# Altium PCB OLED_v2.0.PcbDoc
Units mil, origin at the board's own origin, x right, y up, seen from the top; angles counter-clockwise.
Board outline 1122.05 x 1377.95 mil, 2 copper layers (Top Layer, Bottom Layer), stack 57 mil thick; 27 components, 23 nets, 117 pads, 22 vias.
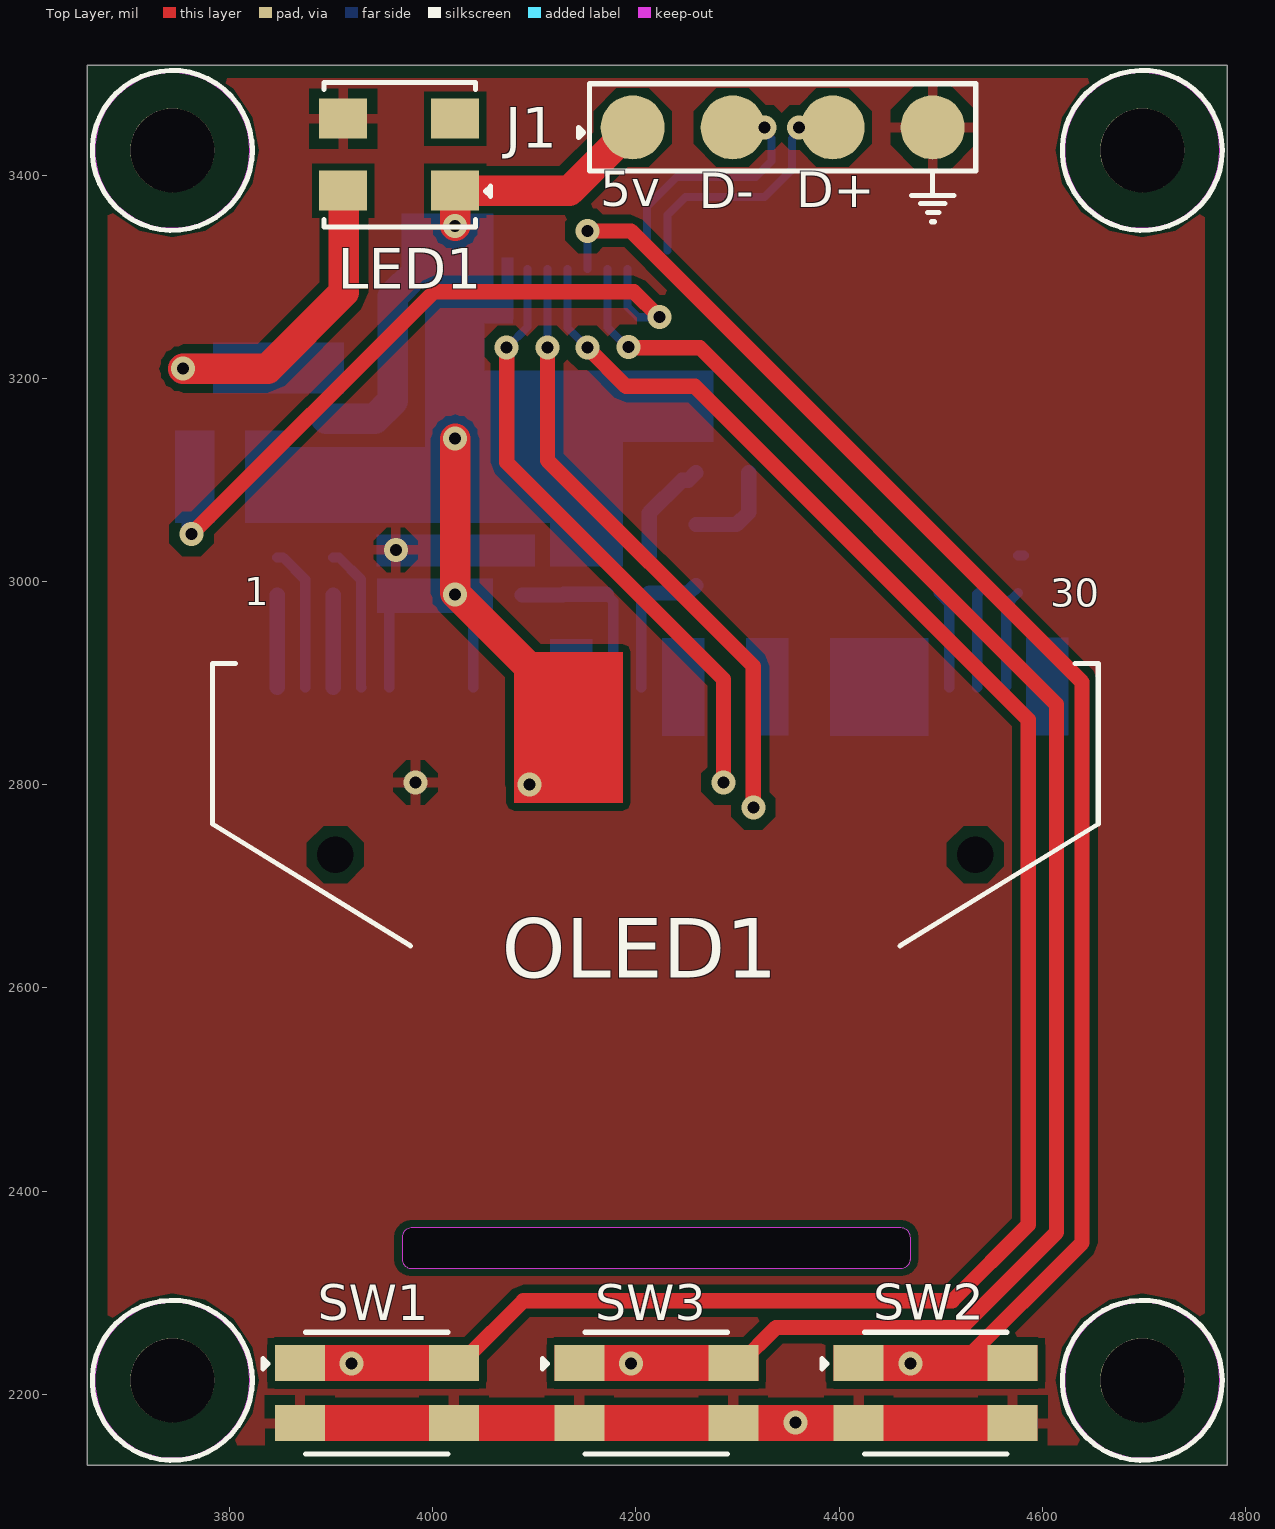
[diagram p0: Top Layer view]
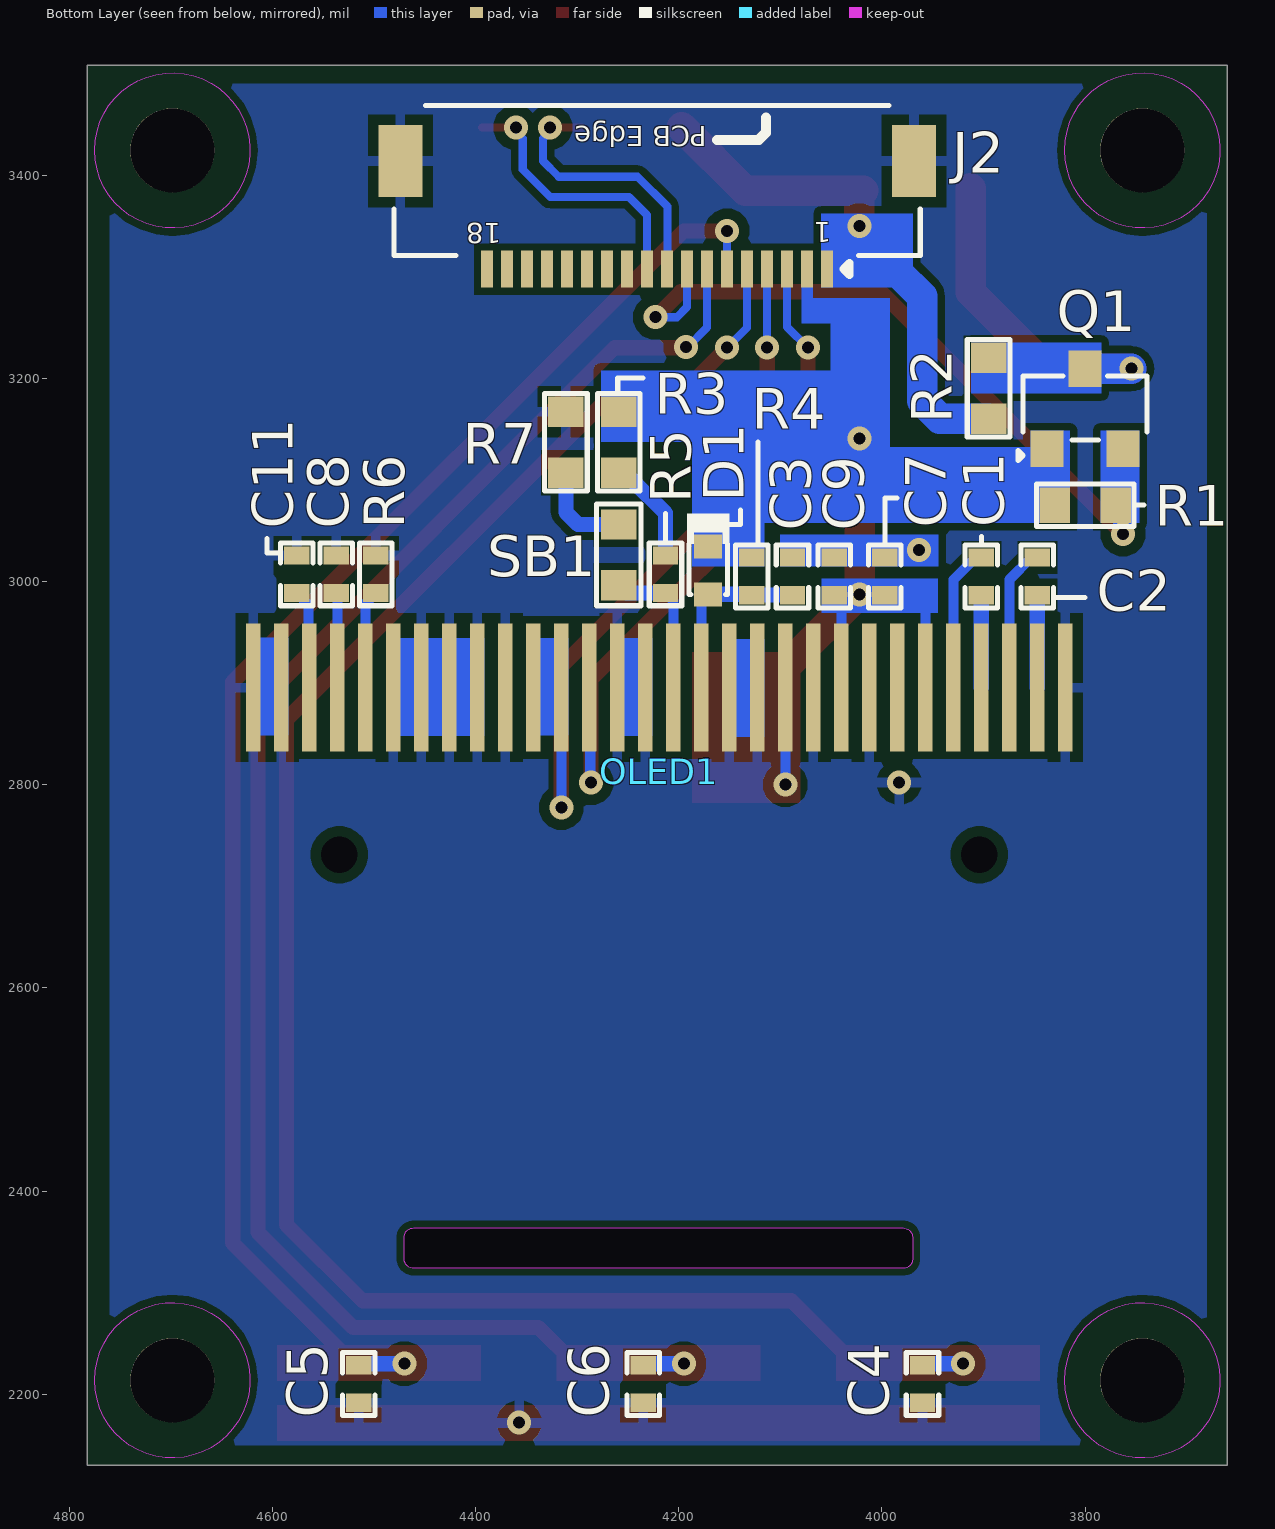
[diagram p1: Bottom Layer view, seen from below]
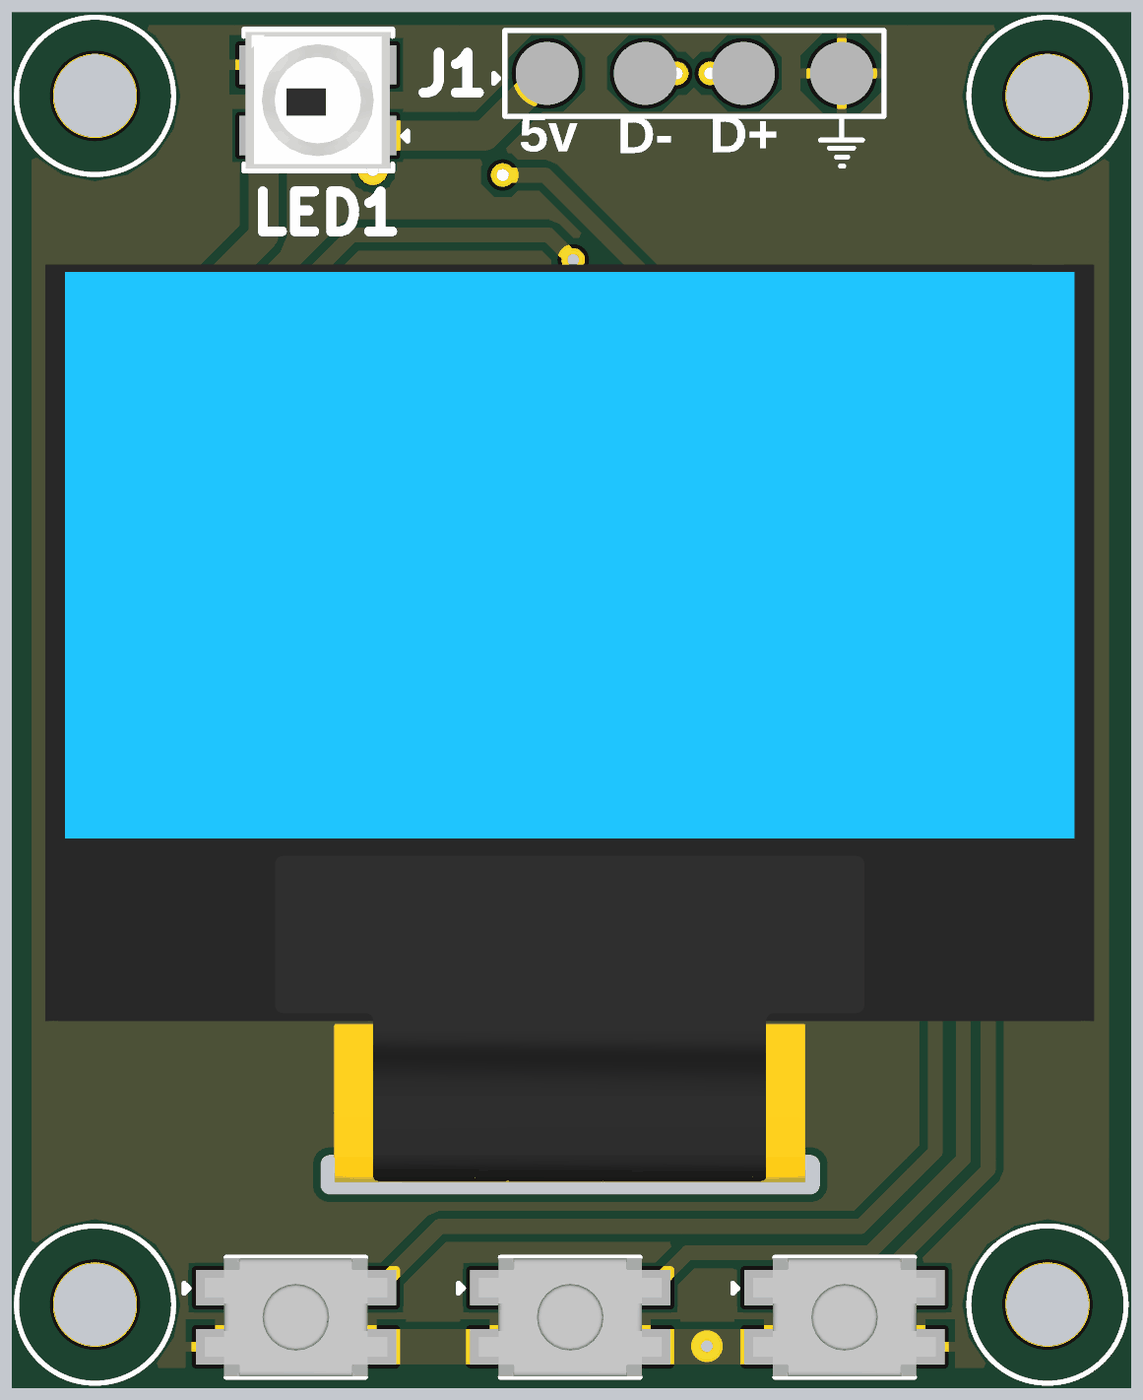
[diagram p2: 3D render of the assembled board from above, using the file's embedded part models]
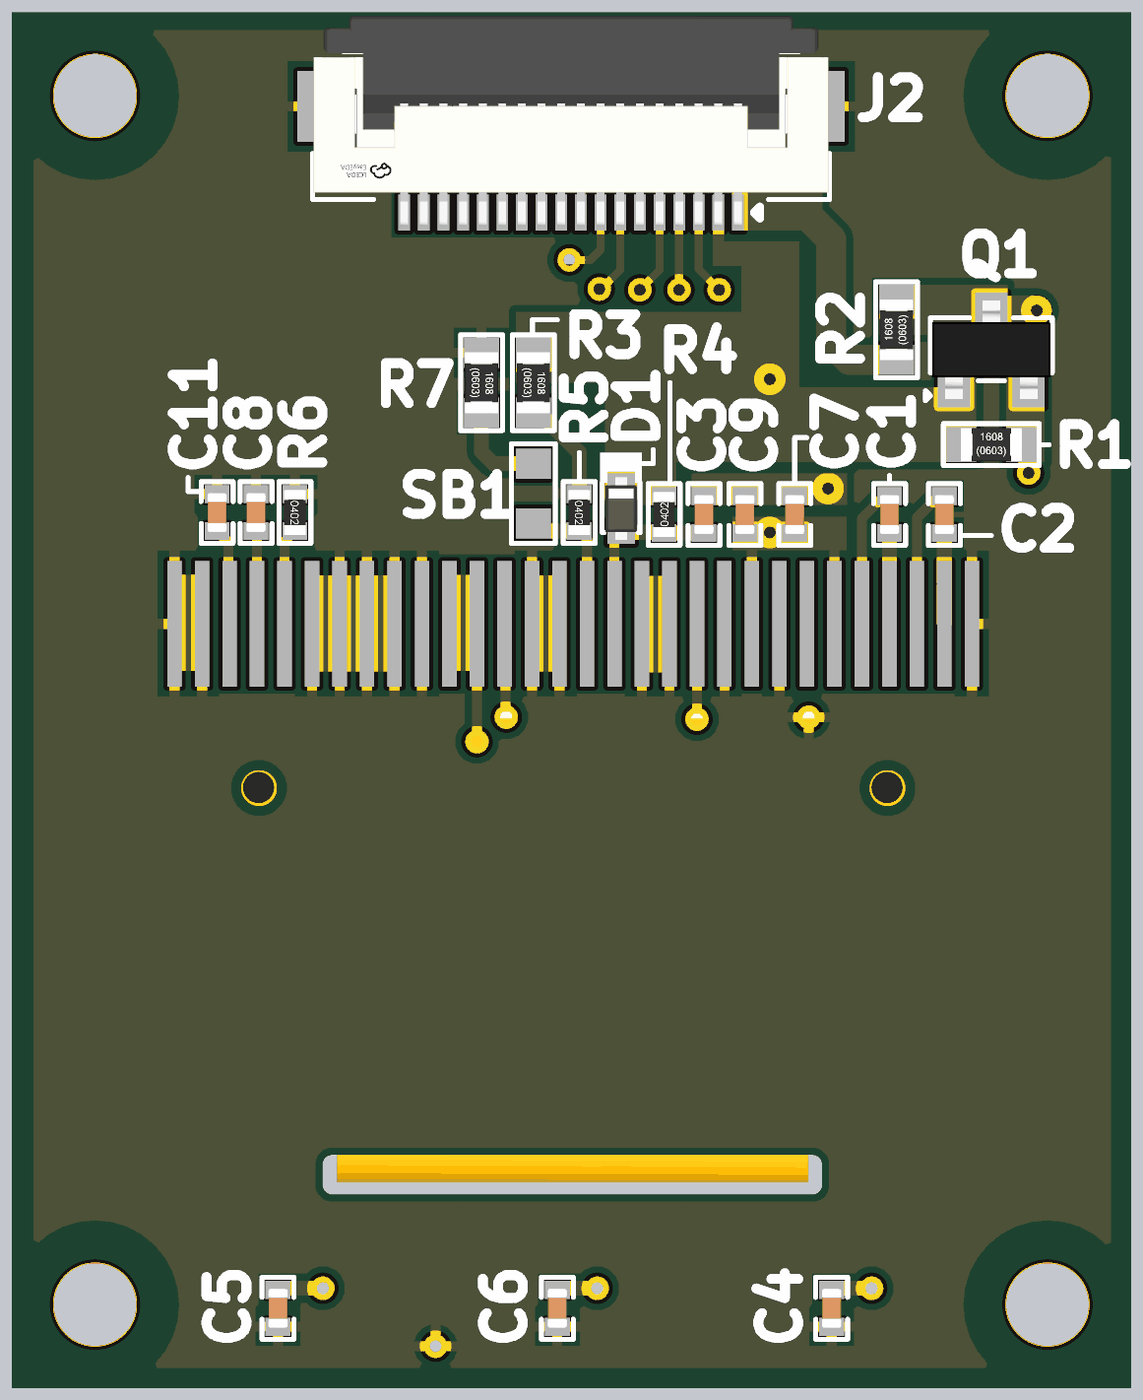
[diagram p3: 3D render of the assembled board from below, using the file's embedded part models]

## Layer stack, top to bottom
Top Solder: solder mask 3, Solder Resist, Dk 3.5
Top Layer: signal copper 10
Dielectric 1: dielectric 37, FR-4, Dk 4.8
Bottom Layer: signal copper 10
Bottom Solder: solder mask 3, Solder Resist, Dk 3.5

## Board outline
3660,2130 3660,3507.95 4782.05,3507.95 4782.05,2130
cut-out: 3969.74,2332.92 ccw(c3978.62,2332.92) 3978.62,2324.03 4460.75,2324 ccw(c4460.75,2333.52) 4470.19,2332.34 ccw(c4470,2332.52) 4470.27,2332.52 4470.27,2354.11 ccw(c4460.74,2354.11) 4460.74,2363.64 4460.21,2363.64 3978.97,2363.64 ccw(c3978.97,2354.43) 3969.77,2354.43

## Design rules (kind name [scope] priority, off if disabled: settings)
Clearance Clearance_TOP [All] p1: gap=10 ignorepadtopadclearanceinfootprint=FALSE except(0: Arc-Hole Track-Hole SMDPad-Hole THPad-Hole Via-Hole Fill-Hole Poly-Hole Region-Hole Text-Hole; 6: SMDPad-SMDPad; 7: Arc-Fill Arc-Poly Arc-Region Track-Fill Track-Poly Track-Region SMDPad-Fill SMDPad-Poly SMDPad-Region Fill-Fill Fill-Poly Fill-Region Poly-Poly Poly-Region Region-Region; 8: Arc-SMDPad Track-SMDPad)
Clearance Clearance_BOTTOM [All] p2: gap=10 ignorepadtopadclearanceinfootprint=FALSE except(0: Arc-Hole Track-Hole SMDPad-Hole THPad-Hole Via-Hole Fill-Hole Poly-Hole Region-Hole Text-Hole; 6: Arc-Fill Arc-Poly Arc-Region Track-Fill Track-Poly Track-Region SMDPad-SMDPad SMDPad-Fill SMDPad-Poly SMDPad-Region Fill-Fill Fill-Poly Fill-Region Poly-Poly Poly-Region Region-Region; 8: Arc-SMDPad Track-SMDPad)
DiffPairsRouting [InDifferentialPairClass('USB_DIFF_Lines')] p1: maxlimit=12 minlimit=12 mostfreqgap=12 toplayer_minwidth=8 toplayer_maxwidth=8 toplayer_prefwidth=8 bottomlayer_minwidth=8 bottomlayer_maxwidth=8 bottomlayer_prefwidth=8 impedanceprofiledriven=TRUE impedanceprofileid={845F8E85-610F-405B-9380-0A08DA0184CC} impedanceprofilevalue=90.000000 maxuncoupledlength=500
HoleSize [All] p1: absolutevalues=TRUE maxlimit=1000 minlimit=1 maxpercent=80.000 minpercent=20.000
MatchedLengths "Schematic Matched Net Lengths" [InNetClass('USB_DIFF')] p1: tolerance=20 checknetsindiffpair=TRUE checkdiffpairvsdiffpair=FALSE checkxsignals=FALSE checkothers=FALSE
MaxMinImpedance "Schematic Impedance Constraint" [InNetClass('USB_DIFF')] p1: minimum=85.00 maximum=95.00
MinimumSolderMaskSliver [All] p1: minsoldermaskwidth=0
PolygonConnect [All] p1: connectstyle=Relief reliefconductorwidth=10 reliefentries=4 polygonreliefangle="90 Angle" airgapwidth=10
RoutingVias [All] p1: holewidth=11.81 width=23.62 viastyle="Through Hole" minholewidth=11.81 minwidth=23.62 maxholewidth=11.81 maxwidth=23.62
SilkToSilkClearance [All] p1: silktosilkclearance=0
SilkToSolderMaskClearance [IsPad] p1: minsilkscreentomaskgap=0 clearancetoexposedcopper=TRUE
SolderMaskExpansion [All] p1: expansion=4 istentingtop=FALSE
Width [All] p1: maxlimit=30 minlimit=8 preferedwidth=15 toplayer_minwidth=10 minimp=50.000000 maximp=50.000000 favimp=50.000000
25 further rules are at their usual default settings.

## Classes and differential pairs
differential pair class USB_DIFF_Lines: USB
net class USB_DIFF: USB_N USB_P
differential pair USB: +USB_P -USB_N

## Components (designator, comment, footprint, x,y, rotation, side; value= is the part's Value field where it differs from the comment)
C1 "1uF" Cap-0402 3902,3005 r270 bottom
C2 "1uF" Cap-0402 3847,3005 r270 bottom
C3 "1uF" Cap-0402 4088,3005 r270 bottom
C4 "0.1uF" Cap-0402 3960,2210 r90 bottom
C5 "0.1uF" Cap-0402 4515,2210 r90 bottom
C6 "0.1uF" Cap-0402 4235,2210 r90 bottom
C7 "0.1uF" Cap-0402 3997,3005 r90 bottom
C8 "4.7uF" Cap-0402 4537,3007 r270 bottom
C9 "1uF" Cap-0402 4047,3005 r90 bottom
C11 "2.2uf" Cap-0402 4576,3007 r270 bottom
D1 "1SS355WT" SOD-523 4171,3010.93 r90 bottom
J1 "POGO Connector 4 Pin" "Pogo 4 Pin" 4344.43,3446.82 r0 top
J2 "F0502-B-18-15T-R" F0502-B-18-15T-R 4221.2,3360.58 r0 bottom locked
LED1 "WS2812B-Mini" WS2812B-Mini 3967,3420 r180 top
OLED1 "N096-2864KSWEG01-H30" N096-2864KSWEG01-H30 4219.04,2977.73 r0 top locked
Q1 "BSS138" Sot-23 3800,3170 r180 bottom
R1 "10K" Res-0603 3800,3075 r0 bottom value=10kR
R2 "10K" Res-0603 3895,3190 r270 bottom value=10kR
R3 "10K" Res-0603 4259,3137 r90 bottom value=10kR
R4 "4.7K" Res-0402 4128,3005 r90 bottom value=4.7kR
R5 "0R" Res-0402 4213,3007 r270 bottom
R6 "412K" Res-0402 4498,3007 r270 bottom
R7 "10K" Res-0603 4311,3137 r90 bottom value=10kR
SB1 "Solder Bridge 0603" "Solder Bridge" 4259,3026 r90 bottom
SW1 "TS-1185EC-C-D-B" TS-1185EC-C-D-B_ 3945,2201 r0 top
SW2 "TS-1185EC-C-D-B" TS-1185EC-C-D-B_ 4495,2201 r0 top
SW3 "TS-1185EC-C-D-B" TS-1185EC-C-D-B_ 4220,2201 r0 top

## Footprints (in the part's own frame and the unit in brackets; to place one, negate y for a bottom-side part, rotate by r counter-clockwise, add the part's x,y. Pads: shape width x height; smd on the part's side, far side on the other; paste and mask are expansions set on the pad)
Cap-0402 [mil]
  rect 18x25 smd mask+2.36: 1(-18.5,0) 2(18.5,0)
  silkscreen extent -31,-16 31,16, body extent -20,-10 20,10, height 19
F0502-B-18-15T-R [mm]
  rect 0.3x0.92 smd: 1(-4.25,1.35) 2(-3.75,1.35) 3(-3.25,1.35) 4(-2.75,1.35) 5(-2.25,1.35) 6(-1.75,1.35) 7(-1.25,1.35) 8(-0.75,1.35) 9(-0.25,1.35) 10(0.25,1.35) 11(0.75,1.35) 12(1.25,1.35) 13(1.75,1.35) 14(2.25,1.35) 15(2.75,1.35) 16(3.25,1.35) 17(3.75,1.35) 18(4.25,1.35)
  rect 1.1x1.8 smd: MP1(-6.42,-1.35) MP2(6.42,-1.35)
  silkscreen extent -6.58,-2.74 6.58,1.5, body extent -6.55,-3.66 6.55,1.69, height 2.03
N096-2864KSWEG01-H30 [mm]
  rect 0.37x3.2 smd far side: 1(-10.15,-2.089) 2(-9.45,-2.089) 3(-8.75,-2.089) 4(-8.05,-2.089) 5(-7.35,-2.089) 6(-6.65,-2.089) 7(-5.95,-2.089) 8(-5.25,-2.089) 9(-4.55,-2.089) 10(-3.85,-2.089) 11(-3.15,-2.089) 12(-2.45,-2.089) 13(-1.75,-2.089) 14(-1.05,-2.089) 15(-0.35,-2.089) 16(0.35,-2.089) 17(1.05,-2.089) 18(1.75,-2.089) 19(2.45,-2.089) 20(3.15,-2.089) 21(3.85,-2.089) 22(4.55,-2.089) 23(5.25,-2.089) 24(5.95,-2.089) 25(6.65,-2.089) 26(7.35,-2.089) 27(8.05,-2.089) 28(8.75,-2.089) 29(9.45,-2.089) 30(10.15,-2.089)
  rect 0x0 hole 0.91 unplated: MH(-8,-6.267) MH(8,-6.267)
  silkscreen extent -11.07,-8.54 11.07,-1.49, body extent -13.34,-16.3 13.36,7.06, height 2.1
"Pogo 4 Pin" [mm]
  round 1.6 smd: 1(-3.75,0) 2(-1.25,0) 3(1.25,0) 4(3.75,0)
  silkscreen extent -5.11,-1.09 4.83,1.09
Res-0402 [mil]
  rect 18x25 smd mask+2.17: 1(-18.5,0) 2(18.5,0)
  silkscreen extent -32,-17 32,16, body extent -23,-11 23,11, height 16
Res-0603 [mil]
  rect 30x35 smd: 1(-30,0) 2(30,0)
  silkscreen extent -48,-21 48,21, body extent -31,-17 31,17, height 18
SOD-523 [mm] "SOD-523 Schottky Barrier Diodes (SBD) ROHS"
  rect 0.6x0.7 smd: 1(-0.6,0) 2(0.6,0)
  silkscreen extent -0.61,-0.53 1.42,0.53, body extent -0.8,-0.4 0.8,0.4, height 0.7
"Solder Bridge" [mil] "Solder Bridge ON"
  rect 30x35 smd: 1(-30,0) 2(30,0)
  silkscreen extent -50,-22 50,22
Sot-23 [mm] "TRANS NPN 40V 0.6A SOT23"
  rect 0.82x0.92 smd: 1(-0.95,-1) 2(0.95,-1) 3(0,1)
  silkscreen extent -1.68,-1.3 1.55,0.81, body extent -1.5,-1.25 1.5,1.25, height 1.05
TS-1185EC-C-D-B_ [mm]
  rect 1.25x0.9 smd: 1(-1.925,0.75) 1(1.925,0.75) 2(-1.925,-0.75) 2(1.925,-0.75)
  silkscreen extent -2.84,-1.52 1.78,1.52, body extent -2.33,-1.5 2.32,1.5, height 2
WS2812B-Mini [mm] "SMD,3.5x3.5mm Light Emitting Diodes (LED) RoHS"
  rect 1.2x1 smd: 1(-1.4,0.9) 2(-1.4,-0.9) 3(1.4,-0.9) 4(1.4,0.9)
  silkscreen extent -2.29,-1.8 1.88,1.8, body extent -1.84,-1.74 1.84,1.74, height 1.95

## Part data
C1 C2 C3 C9: library part CC0402KRX5R6BB105, "CAP CER 1UF 10V X5R 0402", Case Code (Imperial)=0402, Case Code (Metric)=1005, Dielectric=X5R, LCSC Part Number=C106254, Manufacturer=Yageo, Max Operating Temperature=85°C, Min Operating Temperature=-55°C, Package Quantity=1, Resistor Type=Ceramic, Supplier Part Number 1=603-CC402KRX5R6BB105, Tolerance=10%, Voltage Rating=10V, Capacitance=1uF, Case/Package=0402, Category="Ceramic Capacitors", ComponentLink1Description=https://datasheet.ciiva.com/176/upy-gphc-x5r-4v-to-50v-12-176704.pdf?src-supplier=Digi-Key, ComponentLink1URL=https://datasheet.ciiva.com/176/upy-gphc-x5r-4v-to-50v-12-176704.pdf?src-supplier=Digi-Key, ComponentLink2Description=https://datasheet.ciiva.com/176/mlccorderingcode-176705.pdf?src-supplier=Digi-Key, ComponentLink2URL=https://datasheet.ciiva.com/176/mlccorderingcode-176705.pdf?src-supplier=Digi-Key, ComponentLink3Description=https://datasheet.ciiva.com/176/mlccorderingcode-176706.pdf?src-supplier=Digi-Key, ComponentLink3URL=https://datasheet.ciiva.com/176/mlccorderingcode-176706.pdf?src-supplier=Digi-Key, Construction=Flat, Depth=0.5mm, Dissipation Factor=15%, Halogen Free="Halogen Free", Height=0.5mm, Lead Free="Lead Free", Length=1mm, Manufacturer Part Number=CC0402KRX5R6BB105, Mount="Surface Mount", Number of Pins=2, Packaging="Tape and Reel", Pricing 1="1=0.11000, 10=0.05500, 50=0.05500, 100=0.03300, 500=0.02700, 1000=0.02200, 2500=0.02100, 10000=0.01800 (USD)", Radiation Hardening=No, REACH SVHC="No SVHC", RoHS=Yes, RoHS Compliant=Yes, Series=CC, Stock 1=6711367, Supplier 1=Mouser, Termination=SMD/SMT, Thickness=0.022inch, Voltage Rating (DC)=10V, Width=0.02inch
  C9: Item Type=Capacitor
C4 C5 C6 C7: library part C1005X5R1H104K050BB, "CAP CER 0.1UF 50V X5R 0402", Capacitance=100nF, Case Code (Imperial)=0402, Case Code (Metric)=1005, Dielectric=X5R, Dielectric Material=Ceramic, LCSC Part Number=C2181865, Manufacturer=TDK, Max Operating Temperature=85°C, Min Operating Temperature=-55°C, Package Quantity=1, Supplier Part Number 1=445-5942-1-ND, Tolerance=10%, Voltage=50V, Case/Package=0402, ComponentLink1Description=https://product.tdk.com/info/en/catalog/spec/mlccspec_commercial_general_midvoltage_en.pdf?src-supplier=Digi-Key, ComponentLink1URL=https://product.tdk.com/info/en/catalog/spec/mlccspec_commercial_general_midvoltage_en.pdf?src-supplier=Digi-Key, ComponentLink2Description=http://www.tdk.co.jp/tefe02/e413_c.pdf?src-supplier=Future+Electronics, ComponentLink2URL=http://www.tdk.co.jp/tefe02/e413_c.pdf?src-supplier=Future+Electronics, ComponentLink3Description=https://www.verical.com/server-webapp/html/getDatasheet?partID=743571&src-supplier=Verical, ComponentLink3URL=https://www.verical.com/server-webapp/html/getDatasheet?partID=743571&src-supplier=Verical, ComponentLink4Description=http://www.tdk.co.jp/tefe02/e412_c.pdf?src-supplier=Avnet+Europe, ComponentLink4URL=http://www.tdk.co.jp/tefe02/e412_c.pdf?src-supplier=Avnet+Europe, Construction=Flat, Depth=0.5mm, Height=0.5mm, Item Type=Capacitor, Lead Free="Lead Free", Length=1mm, Manufacturer Part Number=C1005X5R1H104K050BB, Mount="Surface Mount", Packaging="Tape and Reel", Pricing 1="1=0.12, 10=0.09, 50=0.049, 100=0.04, 500=0.02858, 1000=0.02245, 2500=0.02041, 5000=0.01878 (USD)", Radiation Hardening=No, REACH SVHC="No SVHC", Resistor Type=Ceramic, RoHS Compliant=Yes, Series=C, Stock 1=1455182, Supplier 1=Digi-Key, Termination=SMD/SMT, Thickness=0.022inch, Voltage Rating=50V, Voltage Rating (DC)=50V, Weight=2.3E-05oz, Width=0.02inch
C8: library part CC0402KRX5R6BB475, "CAP CER 4.7UF 10V X5R 0402", Case Code (Imperial)=0402, Case Code (Metric)=1005, LCSC Part Number=C326586, Manufacturer=Yageo, Max Operating Temperature=85°C, Min Operating Temperature=-55°C, Supplier Part Number 1=3871698, Tolerance=10%, Voltage Rating=10V, Capacitance=4.7uF, Case/Package=0402, Category="Ceramic Capacitors", ComponentLink1Description=http://www.yageo.com/documents/recent/UPY-GPHC_X5R_4V-to-50V_25.pdf?src-supplier=Digi-Key, ComponentLink1URL=http://www.yageo.com/documents/recent/UPY-GPHC_X5R_4V-to-50V_25.pdf?src-supplier=Digi-Key, Manufacturer Part Number=CC0402KRX5R6BB475, Mount="Surface Mount", Packaging="Cut Tape", Pricing 1="10000=0.02310, 50000=0.02100 (GBP)", RoHS=Yes, RoHS Compliant=Yes, Stock 1=20000, Supplier 1=Farnell
C11: library part GRM155R61E225KE11D, "CAP CER 2.2UF 25V X5R 0402", Capacitance=2.2uF, Case Code (Imperial)=0402, Case Code (Metric)=1005, Dielectric=X5R, LCSC Part Number=C385032, Manufacturer=Murata, Max Operating Temperature=85°C, Min Operating Temperature=-55°C, Package Quantity=10000, Resistor Type=Ceramic, Tolerance=10%, Voltage Rating=25V, Case/Package=0402, Category="Ceramic Capacitors", ComponentLink1Description=http://www.mouser.com/ds/2/281/c02e-2905.pdf?src-supplier=Mouser, ComponentLink1URL=http://www.mouser.com/ds/2/281/c02e-2905.pdf?src-supplier=Mouser, ComponentLink2Description=http://search.murata.co.jp/Ceramy/image/img/A01X/G101/ENG/GRM155R61E225KE11-01.pdf?src-supplier=Digi-Key, ComponentLink2URL=http://search.murata.co.jp/Ceramy/image/img/A01X/G101/ENG/GRM155R61E225KE11-01.pdf?src-supplier=Digi-Key, ComponentLink3Description=http://search.murata.co.jp/Ceramy/image/img/A01X/partnumbering_e_01.pdf?src-supplier=Digi-Key, ComponentLink3URL=http://search.murata.co.jp/Ceramy/image/img/A01X/partnumbering_e_01.pdf?src-supplier=Digi-Key, ComponentLink4Description=http://psearch.en.murata.com/capacitor/product/GRM155R61E225KE11%23.pdf?src-supplier=Avnet, ComponentLink4URL=http://psearch.en.murata.com/capacitor/product/GRM155R61E225KE11%23.pdf?src-supplier=Avnet, Height=0.5mm, Item Type=Capacitor, Lead Free="Lead Free", Length=1mm, Manufacturer Part Number=GRM155R61E225KE11D, Material=Ceramic, Mount="Surface Mount", Packaging="Tape and Reel", Pricing 1="10000=0.03830, 20000=0.03623, 40000=0.03416, 60000=0.03209, 80000=0.03002, 100000=0.02795, 1000000=0.02588 (USD)", RoHS=Yes, RoHS Compliant=Yes, Stock 1=210000, Supplier 1=Avnet, Supplier Part Number 1=GRM155R61E225KE11D, Termination=SMD/SMT, Thickness=0.022inch, Voltage Rating (DC)=25V, Weight=0.000212oz, Width=0.5mm
D1: "80V Single 1.2V@100mA 4ns 100mA SOD-523 Switching Diode ROHS", LCSC Part Part Number=C2836063, Manufacturer=CBI, Package=SOD-523, ComponentLink1Description=LCSC, ComponentLink1URL=https://www.lcsc.com/product-detail/Switching-Diode_CBI-1SS355WT_C2836063.html, Item Type=Diode, Manufacturer Part Number=1SS355WT
J1: "Pogo Pad 2.5mm 4 Pin", Item Type="Pogo Connector", Manufacturer Part Number="POGO Connector 4 Pin"
J2: "Clamshell -25℃~+85℃ 18P Bottom Contact Surface Mount 0.5mm SMD,P=0.5mm FFC/FPC Connectors ROHS", LCSC Part Number=C2889974, Manufacturer=XFCN, Package=SMD,P=0.5mm, ComponentLink1Description=LCSC, ComponentLink1URL=https://www.lcsc.com/product-detail/FFC-FPC-Connectors_XFCN-F0502-B-18-15T-R_C2889974.html, Item Type="FPC Connector", Manufacturer Part Number=F0502-B-18-15T-R
LED1: "SMD,3.5x3.5mm Light Emitting Diodes (LED) RoHS", LCSC Part Number=C527089, Manufacturer=Worldsemi, Package=SMD,3.5x3.5mm, ComponentLink1Description=LCSC, ComponentLink1URL=*https://lcsc.com/product-detail/Light-Emitting-Diodes-LED_Worldsemi-WS2812B-Mini_C527089.html, Item Type="RGB LED", Manufacturer Part Number=WS2812B-Mini
OLED1: "SSD1306 0.96 - OLED Displays Modules ROHS", LCSC Part Number=C2890596, Manufacturer=Newvisio, Package=-, ComponentLink1Description=LCSC, ComponentLink1URL=https://www.lcsc.com/product-detail/span-style-background-color-ff0-OLED-span-Displays-Modules_Newvisio-N096-2864KSWEG01-H30_C2890596.html, Item Type=OLED, Manufacturer Part Number=N096-2864KSWEG01-H30
Q1: "50V 220mA 3.5Ω@10V,220mA 225mW 1.6V@1mA N Channel SOT-23 MOSFETs ROHS", LCSC Part Number=C426569, Manufacturer="Slkor(SLKORMICRO Elec.)", Package=SOT-23, ComponentLink1Description=LCSC, ComponentLink1URL=https://www.lcsc.com/product-detail/MOSFETs_Slkor-SLKORMICRO-Elec-BSS138_C426569.html, Item Type=Mosfet, Manufacturer Part Number=BSS138
R1 R2 R3 R7: library part RT0603BRD0710KL, "RES SMD 10K OHM 0.1% 1/10W 0603", Case/Package=0603, LCSC Part Number=C95204, Manufacturer=Yageo, Max Operating Temperature=155°C, Min Operating Temperature=-55°C, Package Height=0.45mm, Package Length=1.6mm, Package Style=SMTMeter, Package Width=0.8mm, Power=100mW, Rated Temperature=70°C, Resistor Type="FIXED RESISTOR", Supplier Part Number 1=1991391P, Temperature Coefficient=25ppm/°C, Tolerance=0.1%, Working Voltage=75V, Category="Chip SMD Resistors", ComponentLink1Description=https://datasheet.ciiva.com:443/pdfs/VipMasterIC/IC/YAGO/YAGO-S-A0008510989/YAGO-S-A0008510989-1.pdf?src-supplier=IHS+Markit, ComponentLink1URL=https://datasheet.ciiva.com:443/pdfs/VipMasterIC/IC/YAGO/YAGO-S-A0008510989/YAGO-S-A0008510989-1.pdf?src-supplier=IHS+Markit, ComponentLink2Description=https://datasheet.ciiva.com/5624/pyu-rt-1-to-0-05-rohs-l-4-5624351.pdf?src-supplier=Mouser, ComponentLink2URL=https://datasheet.ciiva.com/5624/pyu-rt-1-to-0-05-rohs-l-4-5624351.pdf?src-supplier=Mouser, ComponentLink3Description=https://datasheet.ciiva.com/29721/pyu-rt-1-to-0-05-rohs-l-4-29721177.pdf?src-supplier=Digi-Key, ComponentLink3URL=https://datasheet.ciiva.com/29721/pyu-rt-1-to-0-05-rohs-l-4-29721177.pdf?src-supplier=Digi-Key, Construction=Chip, Item Type=Resistor, Manufacturer Part Number=RT0603BRD0710KL, Mounting Technology="Surface Mount", Packaging="Tape and Reel", Pins=2, Pricing 1="100=0.29800, 250=0.27800, 500=0.25900, 1000=0.23700 (GBP)", Reach SVHC Compliant=Yes, RoHS=Yes, RoHS Compliant=Yes, Stock 1=20510, Supplier 1=Rs, Technology="THIN FILM", Termination=Wraparound
R4: library part ERJ-2GEJ472X, "RES SMD 4.7K OHM 5% 1/10W 0402", Case/Package=0402, Manufacturer=Panasonic, Max Operating Temperature=155°C, Min Operating Temperature=-55°C, Package Height=0.35mm, Package Length=1mm, Package Shape=Rectangular, Package Style=SMTMeter, Package Width=0.5mm, Power=100mW, Rated Temperature=70°C, Resistor Type="FIXED RESISTOR", Supplier Part Number 1=65T8287, Temperature Coefficient=200ppm/°C, Tolerance=5%, Working Voltage=50V, Category="Chip SMD Resistors", ComponentLink1Description=https://datasheet.ciiva.com:443/pdfs/VipMasterIC/IC/PANA/PANA-S-A0009891627/PANA-S-A0009891627-1.pdf?src-supplier=IHS+Markit, ComponentLink1URL=https://datasheet.ciiva.com:443/pdfs/VipMasterIC/IC/PANA/PANA-S-A0009891627/PANA-S-A0009891627-1.pdf?src-supplier=IHS+Markit, ComponentLink2Description=https://datasheet.ciiva.com/11821/0900766b80f806dd-11821328.pdf?src-supplier=Rs, ComponentLink2URL=https://datasheet.ciiva.com/11821/0900766b80f806dd-11821328.pdf?src-supplier=Rs, ComponentLink3Description=https://datasheet.ciiva.com/46377/1678796-46377565.pdf?src-supplier=Element14, ComponentLink3URL=https://datasheet.ciiva.com/46377/1678796-46377565.pdf?src-supplier=Element14, ComponentLink4Description=https://datasheet.ciiva.com/28514/1678796-28514168.pdf?src-supplier=Element14, ComponentLink4URL=https://datasheet.ciiva.com/28514/1678796-28514168.pdf?src-supplier=Element14, ComponentLink5Description=https://datasheet.ciiva.com/16758/70260739-16758341.pdf?src-supplier=Allied+Electronics, ComponentLink5URL=https://datasheet.ciiva.com/16758/70260739-16758341.pdf?src-supplier=Allied+Electronics, ComponentLink6Description=https://datasheet.ciiva.com/16770/70260739-16770309.pdf?src-supplier=Allied+Electronics, ComponentLink6URL=https://datasheet.ciiva.com/16770/70260739-16770309.pdf?src-supplier=Allied+Electronics, Construction=Rectangular, Item Type=Resistor, JESD-609 Code=e3, Manufacturer Part Number=ERJ-2GEJ472X, Mounting Technology="Surface Mount", Packaging="Tape and Reel", Pins=2, Pricing 1="1=0.12600, 10=0.04000, 30=0.01600, 50=0.01400, 100=0.01100, 250=0.00600 (USD)", Reach SVHC Compliant=Yes, Reference Standard=AEC-Q200, RoHS=Yes, RoHS Compliant=Yes, Stock 1=37243, Supplier 1=Avnet, Technology="METAL GLAZE/THICK FILM", Terminal Finish=Nickel, Termination=Wraparound
R5: library part RC0402FR-070RL, "RES 0 OHM JUMPER 1/16W 0402", Case Code (Imperial)=0402, Case Code (Metric)=1005, LCSC Part Number=C106231, Manufacturer=Yageo, Max Operating Temperature=155°C, Max Power Dissipation=63mW, Min Operating Temperature=-55°C, Power Rating=62.5mW, Resistor Type="Thick Film", Supplier Part Number 1=603-RC0402FR-070RL, Temperature Coefficient=200ppm/°C, Tolerance=1%, Voltage Rating=50V, Case/Package=0402, Category="Chip SMD Resistors", ComponentLink1Description=https://datasheet.ciiva.com/8896/pyu-rc0402-51-rohs-l-6-8896149.pdf?src-supplier=Avnet, ComponentLink1URL=https://datasheet.ciiva.com/8896/pyu-rc0402-51-rohs-l-6-8896149.pdf?src-supplier=Avnet, ComponentLink2Description=https://datasheet.ciiva.com/16790/pyu-rc0402-51-rohs-l-6-r-16790444.pdf?src-supplier=Future+Electronics, ComponentLink2URL=https://datasheet.ciiva.com/16790/pyu-rc0402-51-rohs-l-6-r-16790444.pdf?src-supplier=Future+Electronics, Contact Plating=Tin,Matte, Features="Moisture Resistant", Height=0.35mm, Lead Free="Lead Free", Length=1mm, Manufacturer Part Number=RC0402FR-070RL, Mount="Surface Mount", Number of Terminations=2, Packaging="Tape and Reel", Pricing 1="1=0.10000, 10=0.01400, 50=0.01400, 100=0.00600, 1000=0.00300, 5000=0.00200, 10000=0.00100 (USD)", Radiation Hardening=No, Resistance=0R, RoHS=Yes, RoHS Compliant=Yes, Series=RC, Size Code=0402, Stock 1=8556842, Supplier 1=Mouser, Termination=SMD/SMT, Width=0.5mm
R6: library part FRC0402F4123TS, "±1% 412kΩ 0402 Chip Resistor - Surface Mount ROHS", LCSC Part Number=C5126037, Manufacturer=FOJAN, Package=0402, ComponentLink1Description=LCSC, ComponentLink1URL=https://www.lcsc.com/product-detail/Chip-Resistor-Surface-Mount_FOJAN-FRC0402F4123TS_C5126037.html, Item Type=Resistor, Manufacturer Part Number=FRC0402F4123TS
SB1: "Solder Bridge ON", Manufacturer Part Number="Solder Bridge", Item Type="Solder Bridge"
SW1 SW2 SW3: "3mm 2mm Round Button 50mA Top3.65mm SPST 12V SMD Tactile Switches", LCSC Part Number=C318893, Manufacturer=XKB, ComponentLink1Description=LCSC, ComponentLink1URL=https://lcsc.com/product-detail/Tactile-Switches_XKB-Connectivity-TS-1185EC-C-D-B_C318893.html, Manufacturer Part Number=TS-1185EC-C-D-B

## Free pads (board coordinates)
  round 82.68 hole 82.68: MH4(3743.68,2213.68) MH4(3743.68,3424.27) MH4(4698.36,2213.68) MH4(4698.36,3424.27)

## Via types
v1: diameter 23.62, hole 11.81, Top Layer to Bottom Layer, 22 vias

## Nets (pads, with @x,y where several pads share a name; then routed paths per layer and width w, separated by ;. In a path a pad name is that pad's centre, name@x,y a point inside that pad or via, vN(x,y) a via of type N, cw(c..) or ccw(c..) an arc to the next point about the centre after c; other vN are vias at no path point)
3V3: C7.1 C9.1 D1.2 J2.2 OLED1.6 OLED1.9 OLED1.11 Q1.1 R1.2 R3.2 R4.2 | length 1120.7
  Top Layer w30: v1(4022,3140.52) 4022,2988.57 4023.57,2987 4095.02,2915.55 v1(4095.02,2799.98)
  Bottom Layer w10: OLED1.6 3957.23,2978.54 3963.09,2984.39 3991.39,2984.39 3993,2986 C7.1@3996.5,2986 ; C7.1@3993,2982.5 C7.1@3996.5,2986 ; C7.1 C7.1@3996.5,2986 ; 4010.25,2986 C7.1@3996.5,2986 ; 4028.64,3181.56 4028.64,3228.3 ; OLED1.9 4039.91,2979.41 C9.1 ; v1(4095.02,2799.98) OLED1.11
  Bottom Layer w15: 4016,3095 4151.25,3095 4175.62,3119.38 4175.62,3121.12 ; 4175,3120 4175,3120.5 ; 4223.25,3167 R3.2
  Bottom Layer w30: 3837.4,3112.52 3978.52,3112.52 ; 4016,3095 4016,3106.52 4022,3112.52
  other v1: 4022,2987
5V: J1.1 J2.1 LED1.1 R2.2 | length 488.9
  Top Layer w30: v1(4022.12,3350) 4022.12,3380.63 4018.18,3384.57 4134.53,3384.57 J1.1
  Bottom Layer w30: R2.2 3942.82,3160 3960.39,3177.57 3960.39,3280.46 3984.25,3304.32 4018.88,3304.32 4021.99,3307.43
#D/C: OLED1.15 R5.2 SB1.1 | length 145.3
  Bottom Layer w10: OLED1.15 4205.26,2980.76 R5.2
  Bottom Layer w15: R5.2 4251.5,2988.5 SB1.1
#RES: C3.2 D1.1 OLED1.14 R4.1 | length 177.9
  Bottom Layer w10: D1.1 4177.7,2980.61 OLED1.14
  Bottom Layer w15: C3.2 R4.1 4128.81,2987.31 D1.1
BTN1: C4.2 J2.5 SW1.1 | length 1823.6
  Top Layer w15: SW1.1@4029.15,2232 4089.15,2292 4511.29,2292 4586,2366.71 4586,2864 4258,3192 4190.3,3192 v1(4152.3,3230) ; v1@4152.3,3233 v1@4153.8,3231.5
  Bottom Layer w8: J2.5 4132.62,3249.68 v1(4152.3,3230)
  Bottom Layer w15: v1(3920,2230) 3958.5,2230 C4.2
BTN2: C5.2 J2.6 SW2.1 | length 1474.1
  Top Layer w15: v1(4152.3,3345) 4195,3345 4639,2901 4639,2349 4520,2230
  Bottom Layer w8: J2.6 v1(4152.3,3345)
  Bottom Layer w15: v1(4470,2230) 4513.5,2230 C5.2
BTN3: C6.2 J2.7 SW3.1 | length 1636
  Top Layer w15: SW3.1@4137.85,2230 v1(4195,2230) ; v1(4192.88,3230.88) 4193.75,3230 4263,3230 4614,2879 4614,2359.36 4520.39,2265.74 4337.89,2265.74 SW3.1@4302.15,2230
  Bottom Layer w8: J2.7 4171.99,3250.01 4191.12,3230.88 v1(4192.88,3230.88)
  Bottom Layer w15: v1(4195,2230) 4233.5,2230 C6.2
C1N: C1.1 OLED1.5 | length 142.8
  Bottom Layer w10: C1.1 3907.71,3023.5 3929.5,3001.71 3929.5,2895.66 OLED1.5
C1P: C1.2 OLED1.4 | length 91.1
  Bottom Layer w15: C1.2 3902.11,2986.39 OLED1.4
C2N: C2.1 OLED1.3 | length 142.8
  Bottom Layer w10: C2.1 3852.71,3023.5 3874.5,3001.71 3874.5,2895.54 OLED1.3
C2P: C2.2 OLED1.2 | length 91
  Bottom Layer w15: OLED1.2 C2.2
GND: C3.1 C4.1 C5.1 C6.1 C7.2 C8.1 C9.2 C11.1 J1.4 J2.MP1 J2.MP2 LED1.3 OLED1.1 OLED1.8 OLED1.10 OLED1.12 OLED1.13 OLED1.16 OLED1.17 OLED1.21 OLED1.22 OLED1.23 OLED1.24 OLED1.25 OLED1.29 OLED1.30 R6.1 R7.2 SW1.2 SW2.2 SW3.2 | length 52.4
  Bottom Layer w10: C9.2@4041.29,3023.5 C9.2 ; C11.1 C11.1@4581.71,3025.5
  Bottom Layer w15: C9.2 C3.1
  other v1: 4357,2172 3983,2802 3963.57,3031
"LED DATA": J2.8 Q1.2 R1.1 | length 726.4
  Top Layer w15: v1(3762.6,3046.6) 4001,3285 4198,3285 v1(4223,3260)
  Bottom Layer w8: J2.8 4191.67,3270.14 4201.82,3260 v1(4223,3260)
  Bottom Layer w20: v1(3762.6,3046.6) Q1.2
NetC8_2: C8.2 OLED1.27 | length 93.4
  Bottom Layer w10: OLED1.27 4535.97,2987.47 C8.2
NetC11_2: C11.2 OLED1.28 | length 98.2
  Bottom Layer w10: OLED1.28 4564.5,2896.46 4564.5,2977 C11.2
NetLED1_4: LED1.4 Q1.3 R2.1 | length 337.5
  Top Layer w30: v1(3754.37,3209.37) 3837.37,3209.37 3912.5,3284.5 LED1.4@3912.5,3387.08
  Bottom Layer w30: v1(3754.37,3209.37) Q1.3
NetOLED1_26: OLED1.26 R6.2 | length 97.3
  Bottom Layer w10: R6.2 4508.41,2978.09 OLED1.26
NetR3_1: R3.1 R5.1 | length 104.2
  Bottom Layer w15: R5.1 4213,3067.25 4245.25,3099.5 4251.5,3099.5 R3.1
NetR7_1: R7.1 SB1.2 | length 96
  Bottom Layer w15: SB1.2 4299,3056 4311,3068 R7.1
"OLED/ENC SCL": J2.3 OLED1.18 | length 676.4
  Top Layer w15: v1(4072.79,3230) 4072.79,3117.07 4286.19,2903.67 v1@4286.19,2812.06
  Bottom Layer w8: v1(4072.79,3230) 4093.25,3250.46 J2.3
  Bottom Layer w10: v1@4286.19,2812.06 4287.06,2812.94 4287.06,2894.61 OLED1.18
  other v1: 4286.19,2802.06
"OLED/ENC SDA": J2.4 OLED1.19 OLED1.20 | length 711.8
  Top Layer w15: v1(4112.93,3230) 4112.93,3119.04 4315.5,2916.48 v1@4315.5,2787.5
  Bottom Layer w8: v1(4112.93,3230) J2.4
  Bottom Layer w10: v1@4315.5,2787.5 OLED1.19
  other v1: 4315.5,2777.5
USB_N: J1.2 J2.9 | length 251.8
  Top Layer w8: J1.2 v1(4326.71,3446.82)
  Bottom Layer w8: 4211.04,3325.54 4211.04,3368.87 4240.47,3398.3 4318.09,3398.3 4333.52,3413.73 4333.52,3435.78 4326.71,3442.59 v1(4326.71,3446.82)
USB_P: J1.3 J2.10 | length 253.6
  Top Layer w8: v1(4360.33,3446.82) J1.3
  Bottom Layer w8: 4231.04,3325.54 4231.04,3360.58 4248.76,3378.3 4326.37,3378.3 4353.52,3405.45 4353.52,3435.78 4360.33,3442.59 v1(4360.33,3446.82)
pads on no net: J2.11 J2.12 J2.13 J2.14 J2.15 J2.16 J2.17 J2.18 LED1.2 OLED1.7 OLED1.MH

## Polygon pours and split planes (outlines as drawn)
GND on Bottom Layer "GND_L02_P001" (solid, remove dead copper, pour order 1): 3680,3490 4760,3490 4760,2150 3680,2150
GND on Top Layer "GND_L01_P000" (solid, remove dead copper, pour order 0): 3680,3495 4760,3495 4760,2150 3680,2150

## Keep-outs
Keep-Out Layer:
  circle w1: c3743.68,2213.68 r76.41
  circle w1: c4698.36,2213.68 r76.41
  circle w1: c4698.36,3424.27 r76.41
  circle w1: c3743.68,3424.27 r76.41

## Other copper
Top Layer:
  rectangle net BTN1: 3844.61,2212.81 4045.39,2248.24
  rectangle net 3V3: 4080,2782 4187,2930.57
  rectangle net GND: 3844.61,2153.76 4595.39,2189.19
  rectangle net BTN2: 4394.61,2212.81 4595.39,2248.24
  rectangle net BTN3: 4119.61,2212.81 4320.39,2248.24
Bottom Layer:
  rectangle net 3V3: 4067.88,3257.67 4079.22,3318.84
  rectangle net 5V: 3969.25,3289.32 4059.88,3362
  rectangle net 3V3: 4016,3253.94 4079.15,3278.81
  rectangle net 3V3: 4016,3095 4146.4,3175
  rectangle net 3V3: 4022,3137 4276.5,3207.82
  rectangle net 3V3: 3992.12,3122 4050.7,3278.81
  rectangle net 5V: 3990.1,3289.32 4053.88,3325.54
  rectangle net 3V3: 3945,2969 4059.5,3003
  rectangle net GND: 4115.3,2847.07 4157.43,2943.36
  rectangle net GND: 4583.8,2848.3 4625.93,2944.59
  rectangle net GND: 4390.89,2847.8 4488.13,2944.1
  rectangle net "OLED/ENC SDA": 4308.21,2848.54 4350.34,2944.35
  rectangle net GND: 4225.54,2847.8 4267.66,2944.1
  rectangle net GND: 3944.5,3014.5 4100.5,3046
  rectangle net 3V3: 3845,3057.5 4187,3132.5
  rectangle net 3V3: 4115.5,3014.5 4187,3152
  rectangle net "LED DATA": 3746.46,3057.5 3785,3148.74
  rectangle net NetLED1_4: 3783.86,3184.82 3912.5,3235
  rectangle net 3V3: 3815,3057.5 3853.54,3148.74
  rectangle net 3V3: 4115.5,3014.5 4184.78,3046.37

## Silkscreen, mask and mechanical layers (free items; w line width, h text height)
Top Overlay:
  circle w5: c4698.36,3424.27 r78.74
  circle w5: c3743.68,2213.68 r78.74
  circle w5: c4698.36,2213.68 r78.74
  circle w5: c3743.68,3424.27 r78.74
  lines w5: 4471,3380 4513,3380 ; 4472,3380 4492,3380 4492,3403.82 4491.93,3403.82 ; 4480,3372 4504,3372 ; 4487,3363 4498,3363 ; 4491,3354 4494,3354
  text "5v" at 4164.82,3357.34 h60
  text "D-" at 4261.75,3355.63 h60
  text "D+" at 4357.91,3356.34 h60
Bottom Overlay:
  lines w5: 3742,3075 3752,3075 ; 3800,2984 3831,2984 ; 3902,3036 3902,3044 ; 3985,3082 3997,3082 3997,3036 ; 4078,3036 4080.09,3036 ; 4120.38,3036 4122,3036 4122,3137 ; 4139,3070 4139,3056 4150,3056 ; 4213,3038 4213,3067 ; 4235,3200 4260,3200 4260,3185 4259,3185 ; 4592,3028 4605,3028 4605,3042
Dimensions:
  lines w10: 3366.84,2212.68 3690.84,2212.68 3650.84,2246.68 ; 3655.84,2171.68 3689.84,2211.68
  text "Mounting Hole" at 2758.84,2308.68 h60
  text "Dia=3mm" at 2942.84,2195.68 h60
Board Outline:
  lines w0.5: 4470,2332.52 4470,2354.11 ccw(c4460.74,2354.11) 4460.74,2363.37 4460.21,2363.37 3978.97,2363.37 ccw(c3978.97,2354.43) 3970.03,2354.43 3970,2332.92 ccw(c3978.62,2332.92) 3978.62,2324.3 4460.75,2324.27 ccw(c4460.75,2333.52) 4470,2333.52
  lines w1: 3660,2130 4782.05,2130 4782.05,3507.95 3660,3507.95 3660,2130
Fabrication:
  drawing of 191 lines, arcs and shapes, not listed
  text "Layer" at 2040.58,4740 h60
  text "Name" at 2450.49,4740 h60
  text "Material" at 3380.23,4740 h60
  text "Thickness" at 4240,4740 h60
  text "Constant" at 4889.84,4740 h60
  text "Board Layer Stack" at 5459.7,4740 h60
  text "Top Overlay" at 2450.49,4620 h60
  text "Top Solder" at 2450.49,4500 h60
  text "Solder Resist" at 3380.23,4500 h60
  text "0.076mm" at 4240,4500 h60
  text "3.5" at 4889.84,4500 h60
  text "1" at 2040.58,4380 h60
  text "Top Layer" at 2450.49,4380 h60
  text "0.254mm" at 4240,4380 h60
  text "Dielectric 1" at 2450.49,4260 h60
  text "FR-4" at 3380.23,4260 h60
  text "0.940mm" at 4240,4260 h60
  text "4.8" at 4889.84,4260 h60
  text "2" at 2040.58,4140 h60
  text "Bottom Layer" at 2450.49,4140 h60
  text "0.254mm" at 4240,4140 h60
  text "Bottom Solder" at 2450.49,4020 h60
  text "Solder Resist" at 3380.23,4020 h60
  text "0.076mm" at 4240,4020 h60
  text "3.5" at 4889.84,4020 h60
  text "Bottom Overlay" at 2450.49,3900 h60
  text "Total board thickness:" at 2040.58,3780 h60
  text "1.600mm" at 4240,3780 h60
Drill Drawing:
  lines w10: 1918.5,5186.67 1985.16,5186.67 1951.83,5120 1918.5,5186.67 ; 1918.5,5286.67 1935.16,5286.67 1951.83,5270 1968.5,5286.67 1985.16,5286.67 1968.5,5303.33 1985.16,5320 1968.5,5320 1951.83,5336.67 1935.16,5320 1918.5,5320 1935.16,5303.33 1918.5,5286.67 ; 1918.5,5420 1985.16,5420 1985.16,5486.67 1918.5,5486.67 1918.5,5420
  lines w15: 1858.7,5075 8808.83,5075 ; 1858.7,5525 8808.83,5525 ; 2409.58,4925 2409.58,5675 ; 2949.44,4925 2949.44,5675 ; 4039.12,4925 4039.12,5675 ; 4545,4925 4545,5675 ; 5278.8,4925 5278.8,5675 ; 6778.35,4925 6778.35,5675 ; 7368.2,4925 7368.2,5675 ; 8114,4925 8114,5675 ; 1858.7,4925 8808.83,4925 8808.83,5675 1858.7,5675 1858.7,4925
  text "Symbol" at 1948.7,5570 h72
  text "Count" at 2454.58,5570 h72
  text "Hole Size" at 2994.44,5570 h72
  text "Plated" at 4084.12,5570 h72
  text "Hole Type" at 4590,5570 h72
  text "Drill Layer Pair" at 5323.8,5570 h72
  text "Via/Pad" at 6823.35,5570 h72
  text "Pad Shape" at 7413.2,5570 h72
  text "Template" at 8159,5570 h72
  text "2" at 2454.58,5420 h60
  text "0.910mm (35.83mil)" at 2994.44,5420 h60
  text "NPTH" at 4084.12,5420 h60
  text "Round" at 4590,5420 h60
  text "Top Layer - Bottom Layer" at 5323.8,5420 h60
  text "Pad" at 6823.35,5420 h60
  text "Rectangle" at 7413.2,5420 h60
  text "s0hn91" at 8159,5420 h60
  text "4" at 2454.58,5270 h60
  text "2.100mm (82.68mil)" at 2994.44,5270 h60
  text "PTH" at 4084.12,5270 h60
  text "Round" at 4590,5270 h60
  text "Top Layer - Bottom Layer" at 5323.8,5270 h60
  text "Pad" at 6823.35,5270 h60
  text "Rounded" at 7413.2,5270 h60
  text "c210h210" at 8159,5270 h60
  text "22" at 2454.58,5120 h60
  text "0.300mm (11.81mil)" at 2994.44,5120 h60
  text "PTH" at 4084.12,5120 h60
  text "Round" at 4590,5120 h60
  text "Top Layer - Bottom Layer" at 5323.8,5120 h60
  text "Via" at 6823.35,5120 h60
  text "Rounded" at 7413.2,5120 h60
  text "v60h30" at 8159,5120 h60
  text "28 Total" at 2454.58,4970 h60

## Dimensions
3660,2130 to 4782.05,2130 on Dimensions
4782.05,3507.95 to 4782.05,2130 on Dimensions

## Text inside footprints (layer, text, board x,y; h text height)
J2: Bottom Overlay "PCB Edge" at 4172.2,3448.02 h19.68 r180; Bottom Overlay "1" at 4049.88,3353.43 h19.68 r180; Bottom Overlay "18" at 4374.88,3352.43 h19.68 r180
OLED1: Top Overlay "30" at 4607.87,2974.87 h27.56; Top Overlay "1" at 3814.31,2976.36 h27.56